# Altium PCB OmniCore_SDR.PcbDoc (part 8 of 13)
Units mil, origin at the board's own origin, x right, y up, seen from the top; angles counter-clockwise.
Board outline 4724.72 x 2755.91 mil, 8 copper layers (Top, GND 1, Layer 1, Layer 2, GND 2, Layer 3, Power, Bottom), stack 40.468 mil thick; 530 components, 427 nets, 2315 pads, 1715 vias.
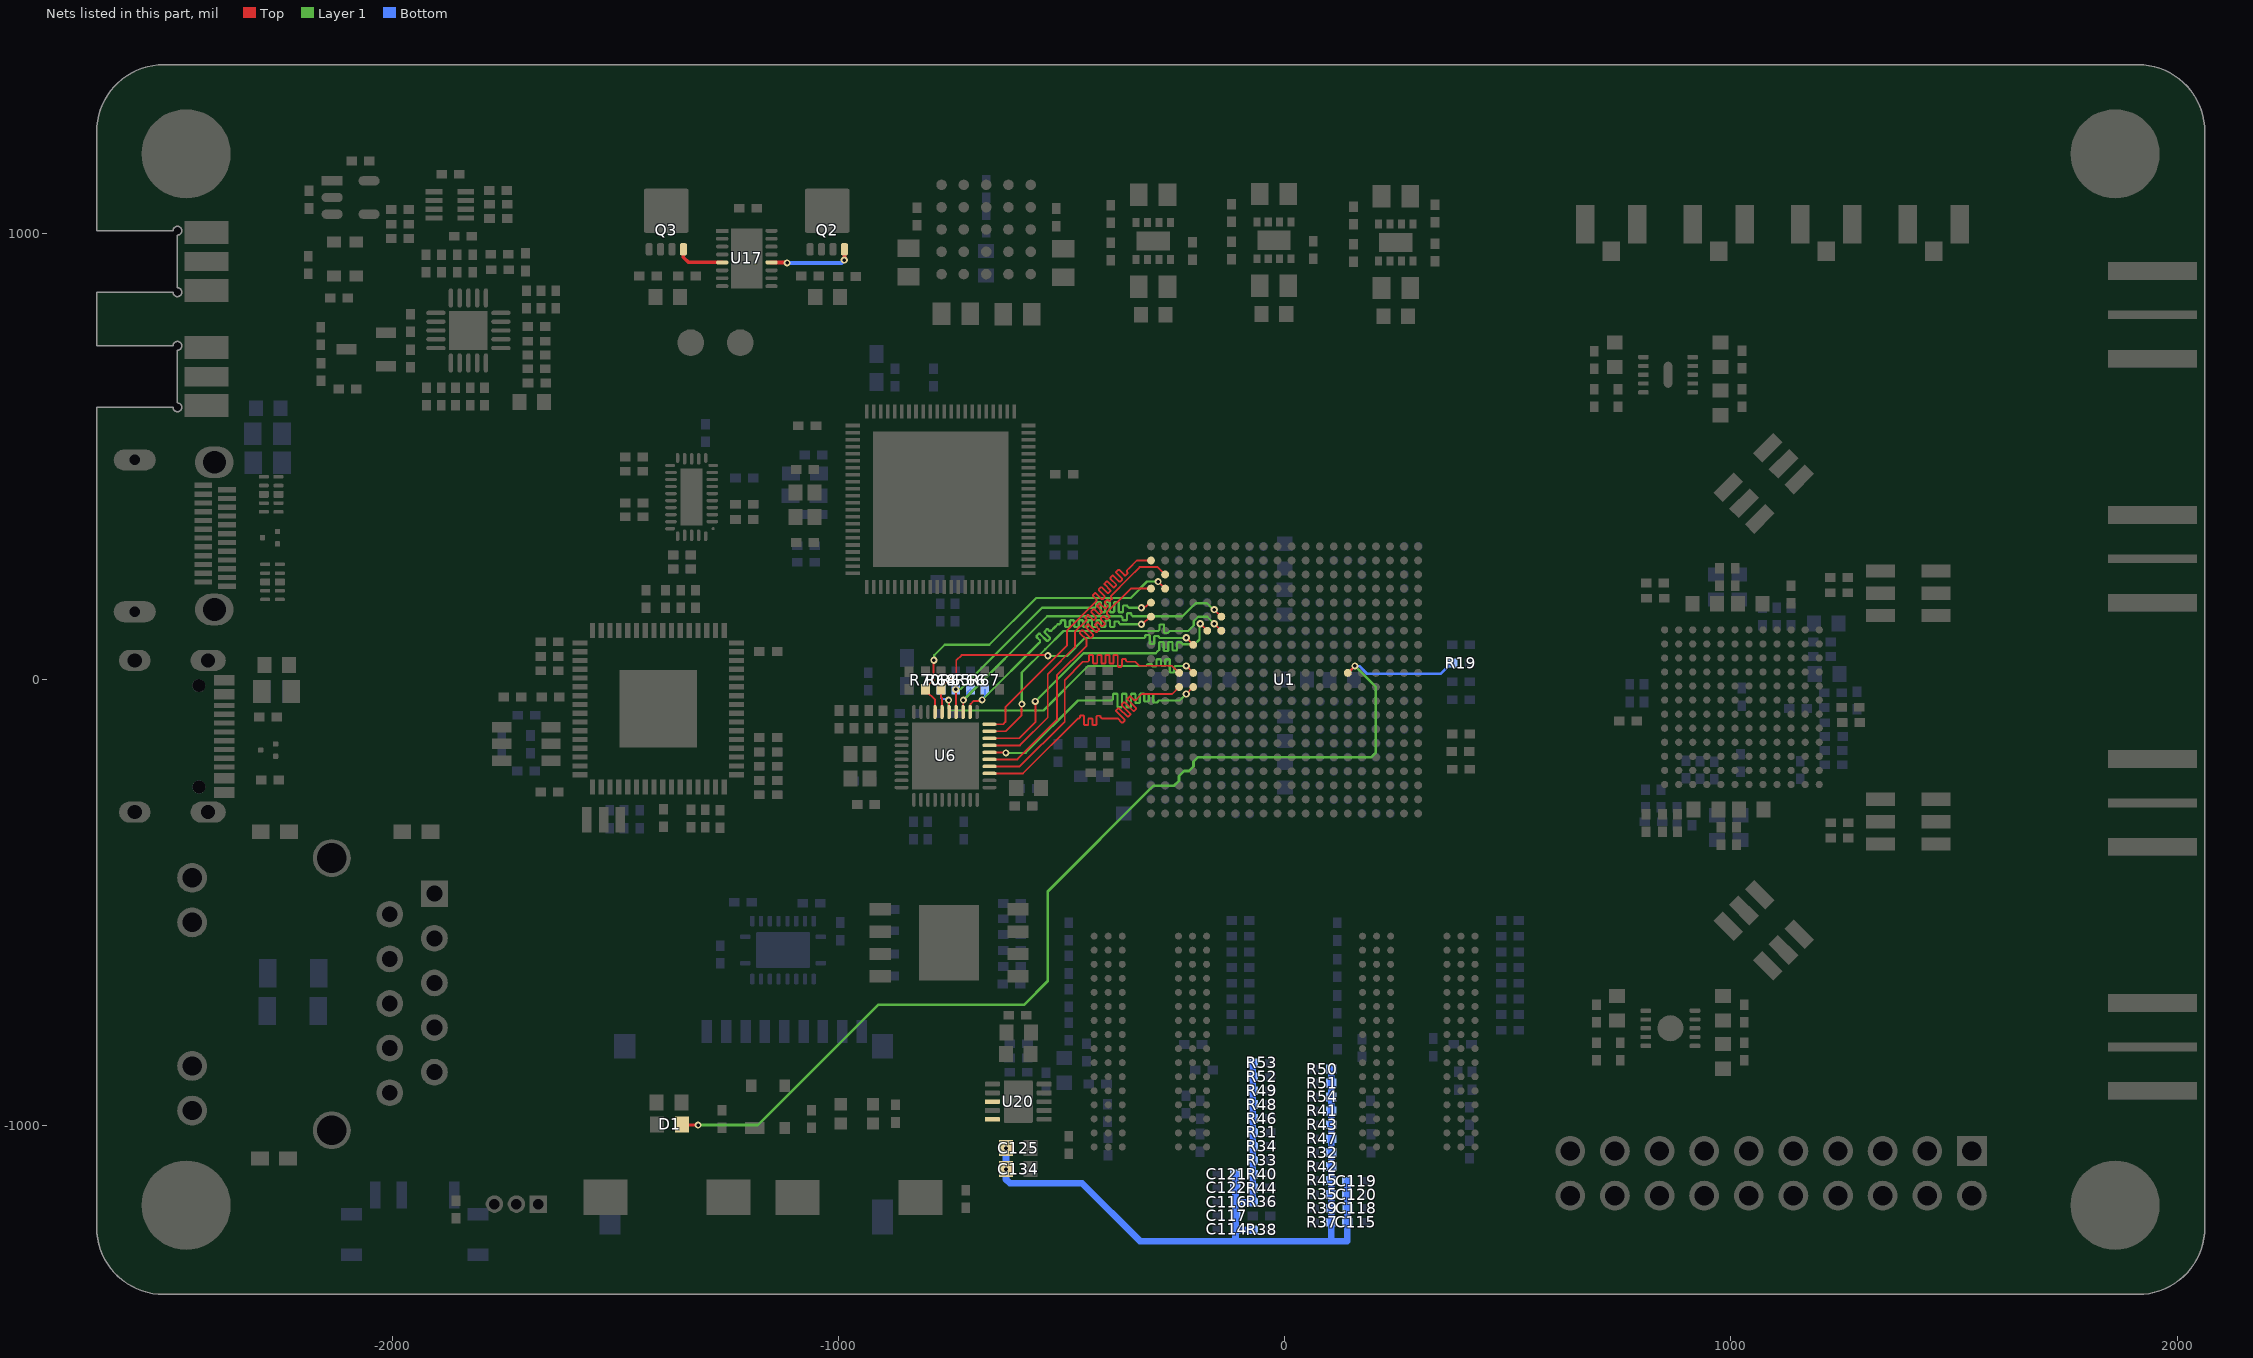
[diagram p13: the nets of this part, all layers, seen from the top]

## Via types
v1: diameter 16, hole 8, Top to Bottom, tented both sides, 1667 vias
v2: diameter 19.68, hole 7.87, Top to Bottom, 44 vias
v3: diameter 200, hole 125, Top to Bottom, 4 vias

## Nets (pads, with @x,y where several pads share a name; then routed paths per layer and width w, separated by ;. In a path a pad name is that pad's centre, name@x,y a point inside that pad or via, vN(x,y) a via of type N, cw(c..) or ccw(c..) an arc to the next point about the centre after c; other vN are vias at no path point) (continued)
DDRVTT: C114.2 C115.2 C116.2 C117.2 C118.2 C119.2 C120.2 C121.2 C122.2 C125.1 C134.1 R31.1 R32.1 R33.1 R34.1 R35.1 R36.1 R37.1 R38.1 R39.1 R40.1 R41.1 R42.1 R43.1 R44.1 R45.1 R46.1 R47.1 R48.1 R49.1 R50.1 R51.1 R52.1 R53.1 R54.1 U20.3 U20.5 | length 1940.6
  Bottom w15: v1(-624.56,-1050) v1(-624.56,-1097) -624.56,-1120.2 -615.96,-1128.8 -454.2,-1128.8 -324.59,-1258.41 -110.31,-1258.41 ; C121.2@-110.31,-1108 C122.2@-110.31,-1139 C116.2@-110.31,-1171 ; R38.1@-71.37,-1233 -109.31,-1233 C114.2@-110.31,-1232 ; R53.1@-71.37,-859 R52.1@-71.37,-890.17 R48.1@-71.37,-952.5 R46.1@-71.37,-983.67 R31.1@-71.37,-1014.83 R34.1@-71.37,-1046 R33.1@-71.37,-1077.17 R40.1@-71.37,-1108.33 R44.1@-71.37,-1139.5 R36.1@-71.37,-1170.67 -71.7,-1171 C116.2@-110.31,-1171 ; R50.1@104.37,-873 R51.1@104.37,-904.18 R54.1@104.37,-935.36 R41.1@104.37,-966.55 R43.1@104.37,-997.73 R47.1@104.37,-1028.91 R32.1@104.37,-1060.09 R42.1@104.37,-1091.27 R45.1@104.37,-1122.45 ; R45.1@105.92,-1124 R45.1@104.37,-1122.45 ; 140.31,-1199.8 140.5,-1199.99 140.5,-1258.41 104.37,-1258.41 ; C119.2@140.31,-1124 140.66,-1124.34 140.66,-1184.66 C118.2@141,-1185 ; -110.31,-1258.41 104.37,-1258.41 ; -110.31,-1258.41 C114.2@-110.31,-1232 ; C114.2@-110.31,-1232 C117.2@-110.31,-1201 C116.2@-110.31,-1171 ; 104.37,-1258.41 R37.1@104.37,-1216 R39.1@104.37,-1184.82 R35.1@104.37,-1153.64 R45.1@104.37,-1122.45
DONE: D1.1 R19.1 U1.R11 | length 2501.9
  Top w6: D1.1@-1349.78,-998.27 v1(-1314.61,-998.27) ; U1.R11@141.49,14.96 v1(157.24,30.71)
  Layer 1 w6: v1(-1314.61,-998.27) -1180.27,-998.27 -911,-729 -584.52,-729 -531,-675.48 -531,-475 -293.76,-237.76 -247.5,-237.76 -237,-227.26 -237,-216.33 -225.67,-205 -214.5,-205 -204.22,-194.72 -204.22,-183.55 -194.67,-174 194.21,-174 204.4,-163.81 204.4,-16.46 v1(157.24,30.71)
  Bottom w6: v1(157.24,30.71) 158.23,29.72 168.28,29.72 185,13 349.35,13 373.35,37 R19.1@375.31,37
ETH_MDC: U1.C10 U6.13 | length 748.4
  Top w4.2: U6.13@-661.6,-210.4 -586.4,-210.4 -463.1,-87.1 -461,-87.1 -458.54,-84.64 -458.54,-81.98 -457.16,-80.6 -450.72,-80.6 -449.34,-81.98 -449.34,-100.72 -447.96,-102.1 -441.52,-102.1 -440.14,-100.72 -440.14,-88.48 -438.76,-87.1 -432.32,-87.1 -430.94,-88.48 -430.94,-100.72 -429.56,-102.1 -423.12,-102.1 -421.74,-100.72 -421.74,-82.3 -420.36,-80.92 -413.92,-80.92 -412.54,-82.3 -412.54,-84.64 -410.08,-87.1 -398.9,-87.1 -374.52,-87.1 -365.18,-96.44 -363.23,-96.44 -358.67,-91.89 -358.67,-89.93 -377.93,-70.67 -377.93,-68.72 -373.38,-64.17 -371.43,-64.17 -352.17,-83.43 -350.22,-83.43 -345.66,-78.88 -345.66,-76.92 -364.92,-57.66 -364.92,-55.71 -360.37,-51.16 -358.42,-51.16 -339.16,-70.42 -337.21,-70.42 -332.65,-65.86 -332.65,-63.91 -351.91,-44.65 -351.91,-42.7 -347.36,-38.15 -345.41,-38.15 -337.52,-46.04 -334.04,-46.04 -326.5,-38.5 -320.28,-32.28 -252.21,-32.28 U1.C10@-236.46,-16.54
ETH_MDIO: U1.C11 U6.14 | length 748.5
  Top w4.2: U6.14@-661.6,-194.6 -593.6,-194.6 -493,-94 -493,-1 -452,40 -443.08,40 -440.98,40 -438.52,42.46 -438.52,53.62 -437.14,55 -430.7,55 -429.32,53.62 -429.32,37.32 -427.94,35.94 -421.5,35.94 -420.12,37.32 -420.12,53.62 -418.74,55 -412.3,55 -410.92,53.62 -410.92,37.32 -409.54,35.94 -403.1,35.94 -401.72,37.32 -401.72,53.62 -400.34,55 -393.9,55 -392.52,53.62 -392.52,37.32 -391.14,35.94 -384.7,35.94 -383.32,37.32 -383.32,53.62 -381.94,55 -375.5,55 -374.12,53.62 -374.12,29.98 -372.74,28.6 -366.3,28.6 -364.92,29.98 -364.92,44.44 -363.54,45.82 -357.1,45.82 -355.72,44.44 -355.72,42.46 -353.26,40 -345,40 -335,40 -326,31 -253,31 -252.75,31 -236.71,14.96 U1.C11@-236.46,14.96
ETH_RX_CLK: R70.2 U1.B17 U6.27 | length 731.7
  Top w4.2: R70.2@-805,-21.69 -805,-19.72 -787,-1.72 -787,42.21 v1(-786.03,43.17) ; R70.2@-803,-25.65 -783.6,-45.05 U6.27@-783.6,-72.6 ; v1(-283.71,219.68) U1.B17@-267.96,203.94
  Layer 1 w5: v1(-786.03,43.17) -785.47,43.74 -785.47,54.53 -762,78 -662,78 -557,183 -345,183 -308.32,219.68 v1(-283.71,219.68)
ETH_RX_CTRL: R68.2 U1.D13 U6.26 | length 731.7
  Top w4.2: U6.26@-767.9,-72.6 -767.9,-42.1 -770,-40 R68.2@-770,-21.69 -770,-19.72 -736,14.28 -736,43 -724,55 -532.23,55 v1(-530.73,53.5) ; v1(-220.72,93.7) U1.D13@-204.97,77.95
  Layer 1 w5: v1(-530.73,53.5) -530.23,53 -488,53 -448,93 -317.75,93 -315.25,93 -312.32,95.93 -312.32,98.5 -310.82,100 -303.82,100 -302.32,98.5 -302.32,81.1 -300.82,79.6 -293.82,79.6 -292.32,81.1 -292.32,95.93 -290.82,97.43 -283.82,97.43 -282.32,95.93 -279.39,93 -256,93 -221.42,93 v1(-220.72,93.7)
ETH_RXD0: R64.2 U1.D11 U6.25 | length 770.1
  Top w4.2: v1(-753,-46) -752.55,-46.45 -752.55,-72.15 U6.25@-752.1,-72.6 ; v1(-220.72,30.71) U1.D11@-204.97,14.96
  Layer 1 w5: v1(-753,-46) -753,-65 -748.5,-69.5 -540.5,-69.5 -440.29,30.71 -324.68,30.71 -310.36,30.71 -307.43,33.64 -305.93,35.14 -298.93,35.14 -297.43,33.64 -297.43,30.71 -295.93,29.21 -288.93,29.21 -287.43,30.71 -287.43,44.18 -285.93,45.68 -278.93,45.68 -277.43,44.18 -277.43,32.21 -275.93,30.71 -268.93,30.71 -267.43,32.21 -267.43,44.21 -265.93,45.71 -258.93,45.71 -257.43,44.21 -257.43,17.21 -255.93,15.71 -248.93,15.71 -247.43,17.21 -247.43,27.78 -244.5,30.71 -242,30.71 v1(-220.72,30.71)
  Bottom w4.2: R64.2@-770,-21.69 -770,-41 -767.26,-43.74 -755.26,-43.74 v1(-753,-46)
ETH_RXD1: R65.2 U1.A16 U6.24 | length 701
  Top w4.2: v1(-737,-22) -736.7,-22.3 -736.7,-72.3 U6.24@-736.4,-72.6 ; v1(-321,161) -318.74,163.26 -311.71,163.26 -302.53,172.44 U1.A16@-299.46,172.44
  Layer 1 w5: v1(-737,-22) -736.04,-21.04 -726.04,-21.04 -544,161 -427.5,161 -425,161 -422.07,163.93 -422.07,172.5 -420.57,174 -413.57,174 -412.07,172.5 -412.07,152.5 -410.57,151 -403.57,151 -402.07,152.5 -402.07,172.5 -400.57,174 -393.57,174 -392.07,172.5 -392.07,152.5 -390.57,151 -383.57,151 -382.07,152.5 -382.07,172.5 -380.57,174 -373.57,174 -372.07,172.5 -372.07,152.5 -370.57,151 -363.57,151 -362.07,152.5 -362.07,164.4 -360.57,165.9 -353.57,165.9 -352.07,164.4 -352.07,163.93 -349.14,161 -343,161 v1(-321,161)
ETH_RXD2: R66.2 U1.F15 U6.23 | length 762.7
  Top w4.2: U6.23@-720.6,-72.6 -720.3,-72.3 -720.3,-46.3 v1(-720,-46) ; v1(-157.72,156.69) U1.F15@-141.98,140.94
  Layer 1 w5: v1(-720,-46) -532,142 -379,142 -366.5,142 -363.57,139.07 -363.57,134.5 -362.07,133 -355.07,133 -353.57,134.5 -353.57,147.15 -352.07,148.65 -345.07,148.65 -343.57,147.15 -343.57,144.93 -340.64,142 -250,142 -229,142 -199.81,171.19 -173.96,171.19 -159.46,156.69 v1(-157.72,156.69)
  Bottom w4.2: v1(-720,-46) -710.92,-36.92 -710.92,-28.61 R66.2@-704,-21.69
ETH_RXD3: R67.2 U1.A15 U6.22 | length 758
  Top w4.2: U6.22@-704.9,-72.6 -704.2,-71.9 -704.2,-57.49 -703.7,-56.99 -703.7,-54.7 -696.75,-47.75 -680.26,-47.75 v1(-678,-45.5) ; v1(-321,124) -318.7,124 -301.76,140.94 U1.A15@-299.46,140.94
  Layer 1 w5: v1(-678,-45.5) -550.37,82.14 -548.6,83.9 -548.6,88.05 -556.07,95.52 -556.07,97.64 -551.13,102.59 -549,102.59 -532.85,86.44 -530.73,86.44 -525.78,91.39 -525.78,93.51 -537.9,105.63 -537.9,107.75 -532.95,112.7 -530.83,112.7 -527.39,109.26 -523.24,109.26 -515.75,116.75 -508.5,124 -507,124 -504.5,124 -501.57,126.93 -501.57,131.5 -500.07,133 -493.07,133 -491.57,131.5 -491.57,119.5 -490.07,118 -483.07,118 -481.57,119.5 -481.57,131.5 -480.07,133 -473.07,133 -471.57,131.5 -471.57,119.5 -470.07,118 -463.07,118 -461.57,119.5 -461.57,131.5 -460.07,133 -453.07,133 -451.57,131.5 -451.57,119.5 -450.07,118 -443.07,118 -441.57,119.5 -441.57,131.5 -440.07,133 -433.07,133 -431.57,131.5 -431.57,119.5 -430.07,118 -423.07,118 -421.57,119.5 -421.57,131.5 -420.07,133 -413.07,133 -411.57,131.5 -411.57,119.5 -410.07,118 -403.07,118 -401.57,119.5 -401.57,131.5 -400.07,133 -393.07,133 -391.57,131.5 -391.57,119.5 -390.07,118 -383.07,118 -381.57,119.5 -381.57,128.88 -380.07,130.38 -373.07,130.38 -371.57,128.88 -371.57,126.93 -368.64,124 -357,124 v1(-321,124)
  Bottom w4.2: v1(-678,-45.5) -678,-43.58 -672,-37.58 R67.2@-672,-21.69
ETH_TX_CLK: U1.A19 U6.20 | length 748.4
  Top w4.2: U6.20@-661.6,-100.1 -631.1,-100.1 -626,-95 -626,-62 -488,76 -488,109.88 -423.36,174.52 -421.87,176.01 -421.87,179.49 -429.76,187.38 -429.76,189.33 -425.21,193.88 -423.26,193.88 -409.93,180.56 -407.98,180.56 -403.43,185.11 -403.43,187.06 -416.75,200.39 -416.75,202.34 -412.2,206.9 -410.25,206.9 -396.92,193.57 -394.97,193.57 -390.41,198.12 -390.41,200.07 -403.74,213.4 -403.74,215.35 -399.19,219.91 -397.24,219.91 -383.91,206.58 -381.96,206.58 -377.4,211.13 -377.4,213.08 -390.73,226.41 -390.73,228.36 -386.18,232.92 -384.23,232.92 -370.9,219.59 -368.95,219.59 -364.39,224.14 -364.39,226.09 -377.72,239.42 -377.72,241.37 -373.17,245.93 -371.22,245.93 -358.57,233.29 -356.62,233.29 -352.07,237.84 -352.07,239.79 -353.34,241.06 -353.34,244.54 -348.44,249.44 -330.95,266.93 U1.A19@-299.46,266.93
ETH_TX_CTRL: U1.F14 U6.19 | length 732
  Top w4.2: U6.19@-661.6,-115.9 -624.9,-115.9 -590,-81 -590,-56 v1(-589,-55) ; v1(-157.72,125.2) U1.F14@-141.98,109.45
  Layer 1 w5: v1(-589,-55) -589,15.74 -536.74,68 -536.45,68 -495.45,109 -285.74,109 -283.24,109 -280.32,111.93 -280.32,122.16 -278.82,123.66 -271.82,123.66 -270.32,122.16 -270.32,106.07 -268.82,104.57 -261.82,104.57 -260.32,106.07 -257.39,109 -232,109 -216.41,109 -204,121.41 -204,130 -203.72,130.28 -203.72,131.2 -193.92,141 -173.53,141 v1(-157.72,125.2)
ETH_TXD0: U1.E14 U6.18 | length 731.7
  Top w4.2: U6.18@-661.6,-131.6 -594.6,-131.6 -558,-95 -558,-50 v1(-559,-49) ; v1(-189.22,125.2) U1.E14@-173.47,109.45
  Layer 1 w5: v1(-559,-49) -451,59 -289,59 -283.66,64.34 -281.16,66.84 -281.16,82.5 -279.66,84 -272.66,84 -271.16,82.5 -271.16,65.5 -269.66,64 -262.66,64 -261.16,65.5 -261.16,82.5 -259.66,84 -252.66,84 -251.16,82.5 -251.16,66.85 -249.66,65.35 -242.66,65.35 -241.16,66.85 -241.16,81.93 -239.66,83.43 -232.66,83.43 -231.16,81.93 -228.23,79 -217,79 -202,79 -191,90 -191,123.42 v1(-189.22,125.2)
ETH_TXD1: U1.B18 U6.17 | length 748.4
  Top w4.2: U6.17@-661.6,-147.4 -593.4,-147.4 -531,-85 -531,12 -470,73 -470,106.94 -445.97,130.97 -444.49,132.46 -444.49,135.93 -446.44,137.89 -446.44,139.84 -441.89,144.4 -439.94,144.4 -429.04,133.5 -427.09,133.5 -422.54,138.06 -422.54,140.01 -433.43,150.9 -433.43,152.85 -428.88,157.41 -426.93,157.41 -416.03,146.51 -414.08,146.51 -409.53,151.07 -409.53,153.02 -420.42,163.91 -420.42,165.86 -415.87,170.42 -413.91,170.42 -403.02,159.53 -401.07,159.53 -396.52,164.08 -396.52,166.03 -402.74,172.25 -402.74,174.2 -398.18,178.76 -396.23,178.76 -393.72,176.24 -391.77,176.24 -387.21,180.8 -387.21,182.75 -388.96,184.5 -388.96,187.98 -349.97,226.97 -324.94,252 -306.09,252 ; -306.06,251.97 -284.5,251.97 U1.B18@-267.96,235.43
ETH_TXD2: U1.D10 U6.16 | length 732
  Top w4.2: U6.16@-661.6,-163.1 -661.02,-163.68 -625.32,-163.68 v1(-624.74,-164.26) ; v1(-220.72,-32.28) U1.D10@-204.97,-16.54
  Layer 1 w5: v1(-624.74,-164.26) -580.26,-164.26 -463,-47 -390,-47 -387.5,-47 -384.57,-44.07 -384.57,-33.5 -383.07,-32 -376.07,-32 -374.57,-33.5 -374.57,-60.5 -373.07,-62 -366.07,-62 -364.57,-60.5 -364.57,-33.5 -363.07,-32 -356.07,-32 -354.57,-33.5 -354.57,-60.5 -353.07,-62 -346.07,-62 -344.57,-60.5 -344.57,-33.5 -343.07,-32 -336.07,-32 -334.57,-33.5 -334.57,-51.14 -333.07,-52.64 -326.07,-52.64 -324.57,-51.14 -324.57,-33.5 -323.07,-32 -316.07,-32 -314.57,-33.5 -314.57,-47.78 -313.07,-49.28 -306.07,-49.28 -304.57,-47.78 -304.57,-33.52 -303.07,-32.02 -296.07,-32.02 -294.57,-33.52 -294.57,-49.93 -293.07,-51.43 -286.07,-51.43 -284.57,-49.93 -281.64,-47 -249,-47 -235.43,-47 v1(-220.72,-32.28)
ETH_TXD3: U1.A17 U6.15 | length 748.4
  Top w4.2: U6.15@-661.6,-178.9 -598.9,-178.9 -510.5,-90.5 -510.5,9.5 -444,76 -444,86 -444,88.97 -459.21,104.18 -459.21,106.13 -454.66,110.69 -452.71,110.69 -435.88,93.86 -433.93,93.86 -429.37,98.41 -429.37,100.37 -446.2,117.19 -446.2,119.14 -441.65,123.7 -439.69,123.7 -422.87,106.87 -420.92,106.87 -416.36,111.42 -416.36,113.38 -425.02,122.03 -425.02,123.98 -420.46,128.54 -418.51,128.54 -409.86,119.88 -407.91,119.88 -403.35,124.44 -403.35,126.39 -412.01,135.04 -412.01,136.99 -407.45,141.55 -405.5,141.55 -399.09,135.13 -397.13,135.13 -392.58,139.69 -392.58,141.64 -398.23,147.29 -398.23,150.77 -354,195 -345.06,203.94 U1.A17@-299.46,203.94
GATE1: Q2.4 U17.12 | length 190.3
  Top w9: U17.12@-1150,934.83 -1115.84,934.83 v1(-1114.92,933.91) ; v1(-987,940) -986.85,940.15 -986.85,964.12 Q2.4@-986.7,964.27
  Bottom w9: v1(-1114.92,933.91) -993.09,933.91 v1(-987,940)
GATE2: Q3.4 U17.5 | length 109.5
  Top w8: Q3.4@-1347.48,964.27 -1347.48,946.69 -1335.62,934.83 U17.5@-1260.48,934.83